# Altium PCB SCD2326控制板-V0.3.PcbDoc (part 2 of 2)
Units mil, origin at the board's own origin, x right, y up, seen from the top; angles counter-clockwise.
Board outline 4055.12 x 2086.61 mil, 2 copper layers (Top Layer, Bottom Layer), stack 12.8 mil thick; 202 components, 132 nets, 638 pads, 241 vias.
Unrouted connection lines stored in the file: 24.
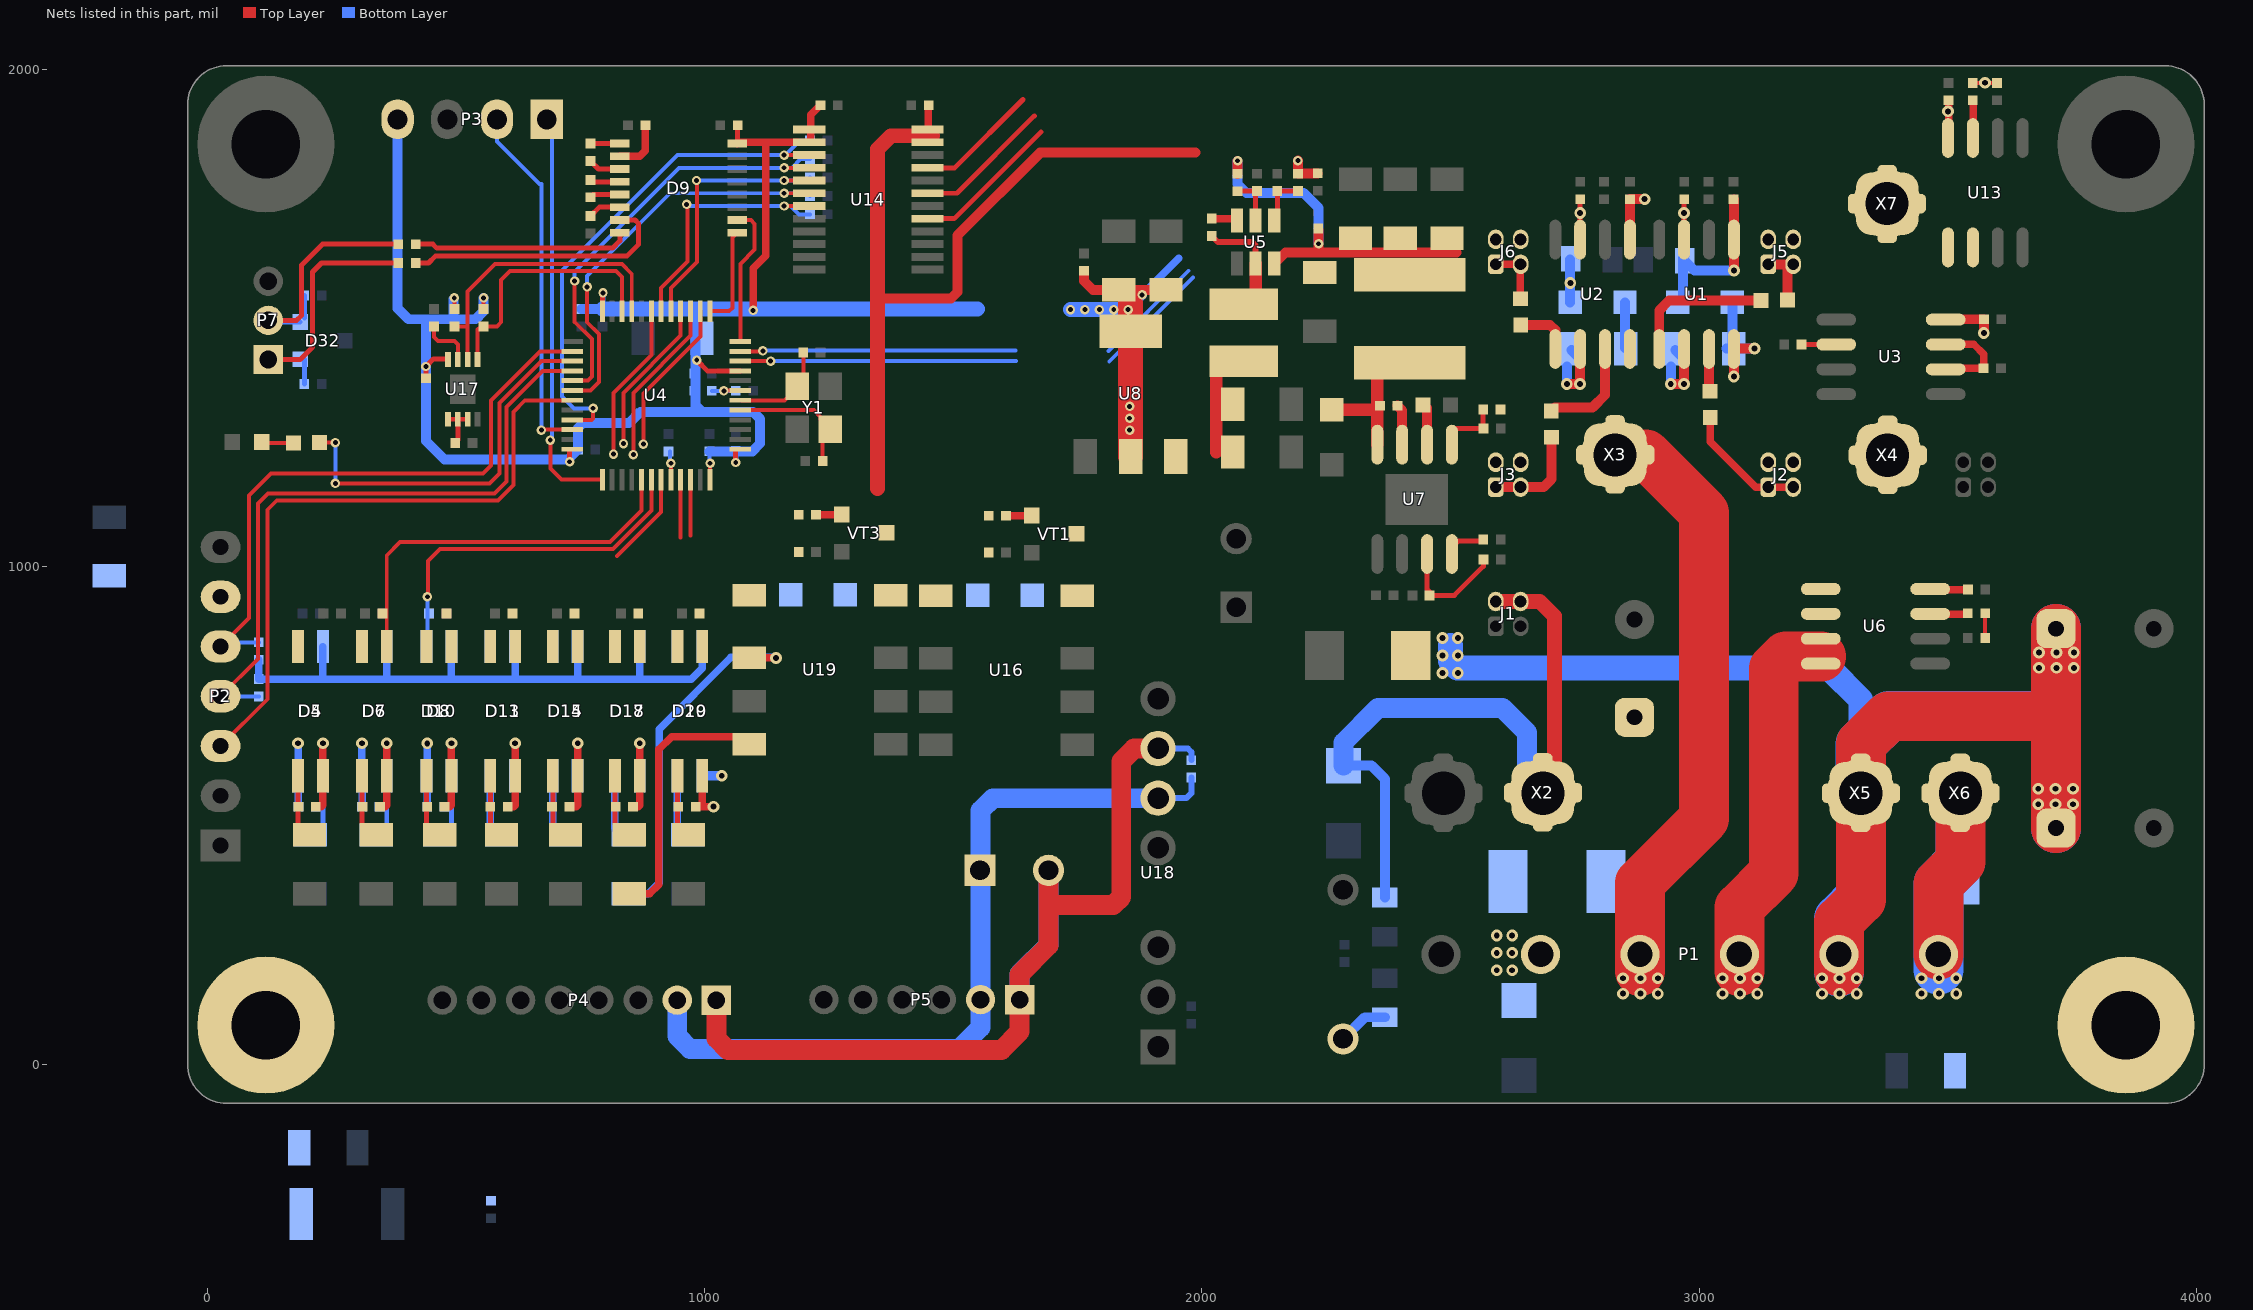
[diagram p2: the nets of this part, all layers, seen from the top]

## Via types
v1: diameter 18.9, hole 9.84, Top Layer to Bottom Layer, tented both sides, 125 vias
v2: diameter 23.62, hole 11.81, Top Layer to Bottom Layer, 114 vias
v3: diameter 18, hole 9.84, Top Layer to Bottom Layer, tented both sides, 2 vias

## Nets (pads, with @x,y where several pads share a name; then routed paths per layer and width w, separated by ;. In a path a pad name is that pad's centre, name@x,y a point inside that pad or via, vN(x,y) a via of type N, cw(c..) or ccw(c..) an arc to the next point about the centre after c; other vN are vias at no path point) (continued)
IN_4: D7.3 R35.2 U4.41 | length 795.1
  Top Layer w8: D7.3@361.19,840 361.19,1023.19 388,1050 810,1050 873.47,1113.47 U4.41@873.47,1175.71
IN_5: D8.3 R41.2 U4.42 | length 719.3
  Top Layer w8: v1@444,939 444,1012 468,1036 815.8,1036 893.16,1113.36 U4.42@893.16,1175.71
  Bottom Layer w8: D8.3@443,851 v1@443,943.81
  other v1: 443,940
IN_6: D10.3 R43.2 U4.43 | length 190.5
  Top Layer w8: 824,1022 912.84,1110.84 U4.43@912.84,1175.71
IN_7: D11.3 D13.3 R46.2 U4.19 | length 319.7
  Top Layer w8: v1@819,1227 817,1229 817,1350 893.16,1426.16 U4.19@893.16,1514.29
  other v1: 817.13,1226.87
IN_8: D14.3 D15.3 R49.2 U4.16 | length 314
  Top Layer w8: v1@837,1248 837,1350 952.21,1465.21 U4.16@952.21,1514.29
  other v1: 837.13,1247.87
IN_9: D17.3 D18.3 R53.2 U4.15 | length 335.9
  Top Layer w8: v1@857,1226 857,1350.2 971.9,1465.1 U4.15@971.9,1514.29
  other v1: 857.13,1225.87
IN_10: D19.3 D20.3 R56.2 U4.14 | length 314.8
  Top Layer w8: v1@877,1247 877,1349 991.58,1463.58 U4.14@991.58,1514.29
  other v1: 877.13,1246.87
LED1: R62.2 U4.27 | length 772.7
  Top Layer w8: R62.2@226,1250 v1(258,1250) ; v1(258,1168) 568,1168 588,1188 588,1330 671.9,1413.9 U4.27@733.71,1413.9
  Bottom Layer w8: v1@258,1170 v1(258,1250)
LIN_U: R13.2 U1.3 U14.19 | length 360.5
  Top Layer w10: U14.19@1448.4,1751.42 1507.79,1751.42 1663.37,1907 ; U1.3@2969.8,1658.24 R13.2@2969.8,1739.3
  other v2: 2969.8,1711.8
LIN_V: R8.2 U2.3 U14.17 | length 382.1
  Top Layer w10: U14.17@1448.4,1700.24 1502.24,1700.24 1677,1875 ; U2.3@2760.8,1658.24 R8.2@2760.8,1739.3
  other v2: 2760.8,1711.8
MCU_EepromSCL: R130.1 U4.21 U17.6 | length 599.6
  Top Layer w8: R130.1@496.98,1483.88 523.88,1483.88 ; U17.6@524,1417 524,1554 579,1609 834,1609 853.79,1589.21 U4.21@853.79,1514.29
MCU_EepromSDA: R131.1 U4.22 U17.5 | length 522.4
  Top Layer w8: U17.5@544,1417 544,1477 550.88,1483.88 R131.1@555.98,1483.88 582.88,1483.88 591,1492 591,1577 609,1595 822,1595 834.1,1582.9 U4.22@834.1,1514.29
MCU_OUT1: R59.2 U4.33 U14.3 | length 1045.7
  Top Layer w8: U4.33@733.71,1295.79 773,1295.79 776,1298.79 v1(776,1319) ; v1(1160.19,1828.19) U14.3@1210.4,1828.19
  Bottom Layer w8: v1(776,1319) 738,1319 714,1343 714,1596 946.19,1828.19 v1(1160.19,1828.19) 1163.19,1828.19 1192.39,1857.39 R59.2@1212.5,1857.39
MCU_PwmUH: R16.2 U4.29 U14.4 | length 887
  Top Layer w8: U4.29@733.71,1374.53 765.53,1374.53 774,1383 774,1458 739,1493 v1(739,1575) v1@739,1576 ; v1(1160.19,1802.6) U14.4@1210.4,1802.6
  Bottom Layer w8: v1(739,1575) 739,1593 948.6,1802.6 v1(1160.19,1802.6) 1175.6,1802.6 1193,1820 R16.2@1212.5,1820
MCU_PwmUL: R17.2 U4.17 U14.5 | length 566.6
  Top Layer w8: U4.17@932.53,1514.29 932.53,1560.53 985,1613 v1@985,1778 ; v1(1160.19,1777.01) U14.5@1210.4,1777.01
  Bottom Layer w8: v1(984.01,1777.01) v1(1160.19,1777.01) 1206.51,1777.01 R17.2@1212.5,1783
MCU_PwmVH: R18.2 U4.30 U14.6 | length 854.2
  Top Layer w8: U4.30@733.71,1354.84 770.84,1354.84 788,1372 788,1468 764,1492 v1(764,1563) ; v1(1160.19,1751.42) U14.6@1210.4,1751.42
  Bottom Layer w8: v1(764,1563) 764,1585 930.42,1751.42 v1(1160.19,1751.42) 1207.08,1751.42 R18.2@1212.5,1746
MCU_PwmVL: R20.2 U4.18 U14.7 | length 540.2
  Top Layer w8: U4.18@912.84,1514.29 912.84,1560.64 966,1613.8 v1@966,1730 ; v1(1160.19,1725.83) U14.7@1210.4,1725.83
  Bottom Layer w8: v1@967.17,1725.83 v1(1160.19,1725.83) 1173.17,1725.83 1190,1709 R20.2@1212.5,1709
  other v1: 964,1729
MOTOR_ALL: C40.1 R29.1 U4.10 | length 842.1
  Top Layer w8: U4.10@1072.29,1413.9 v1(1132.9,1413.9) ; R29.1@3550.15,1973.2 C40.1@3599.15,1973.2
  Bottom Layer w8: v1(1132.9,1413.9) 1626.9,1413.9 ; 1813.9,1412.9 1982.55,1581.55
  other v2: 3575,1973.57
MOTOR_U: C17.1 R12.1 U4.11 | length 828.8
  Top Layer w8: U4.11@1072.29,1433.58 v1@1118.58,1433.58 ; C17.1@3575.2,856.96 R12.1@3575.2,905.96
  Bottom Layer w8: v1@1120,1435 1625,1435 ; 1812,1434 1973.55,1595.55
  other v1: 1117.58,1434.58
NetC3_2: C3.2 D4.1 R22.1 | length 93.1
  Bottom Layer w10: 232.81,487.04 D4.1@232.81,580.16
NetC5_2: C5.2 D1.2 U1.8 | length 298.6
  Top Layer w20: v2(3069.8,1382.8) U1.8@3069.8,1438.24 ; U1.8@3069.8,1439 v2(3111.43,1439)
  Bottom Layer w20: C5.2@3055.24,1439.25 v2@3111.18,1439.25 ; C5.2@3066.94,1442.12 D1.2@3066.94,1531.79 ; v2@3070.06,1383.06 C5.2@3070.06,1439
NetC6_2: C6.2 U7.6 | length 82.1
  Top Layer w20: C6.2@2446.74,1325.61 2452.92,1319.43 U7.6@2452.92,1246.02
NetC8_2: C8.2 D2.2 U2.8 | length 91.7
  Bottom Layer w20: C8.2@2850.94,1440.12 D2.2@2850.94,1531.79
NetC10_2: C10.2 D5.1 R30.1 | length 95.7
  Top Layer w10: R30.1@182.81,484.42 D5.1@182.81,580.16
NetC11_2: C11.2 D13.1 R45.1 | length 95.7
  Top Layer w10: R45.1@569.38,484.42 D13.1@569.38,580.16
NetC12_2: C12.2 D15.1 R48.1 | length 95.7
  Top Layer w10: R48.1@695.15,484.42 D15.1@695.15,580.16
NetC14_2: C14.2 D6.1 R32.1 | length 97.7
  Bottom Layer w10: R32.1@361.19,482.42 D6.1@361.19,580.16
NetC19_2: C19.2 D7.1 R34.1 | length 95.7
  Top Layer w10: R34.1@311.19,484.42 D7.1@311.19,580.16
NetC20_2: C20.2 D8.1 R40.1 | length 94.7
  Bottom Layer w10: 491.19,485.42 D8.1@491.19,580.16
NetC22_2: C22.2 D10.1 R42.1 | length 95.7
  Top Layer w10: R42.1@441.19,484.42 D10.1@441.19,580.16
NetC30_1: C30.1 U7.7 | length 95.9
  Top Layer w10: C30.1@2393.24,1324.18 C30.1@2402.92,1314.5
  Top Layer w20: C30.1@2393.24,1324.18 2402.92,1314.5 U7.7@2402.92,1246.02
NetC30_2: C30.2 D12.2 FL4.1 U7.8 | length 250.3
  Top Layer w25: D12.2@2261.79,1315.94 C30.2@2349.99,1315.94 ; FL4.1@2339.06,1402.38 2352.92,1388.53 U7.8@2352.92,1246.02
NetC52_2: C52.2 D18.1 R52.1 | length 95.7
  Top Layer w10: R52.1@819.93,484.42 D18.1@819.93,580.16
NetC55_2: C55.2 D20.1 R55.1 | length 95.7
  Top Layer w10: R55.1@945.71,484.42 D20.1@945.71,580.16
NetC71_1: C71.1 U5.6 | length 52.5
  Top Layer w15: C71.1@2020,1700.5 2066.89,1700.5 U5.6@2070.84,1696.54
NetC71_2: C71.2 FL6.1 U5.2 | length 224.3
  Top Layer w12: C71.2@2020,1665.5 2032.5,1653 2101.22,1653 2108.25,1645.97 U5.2@2108.25,1609.93
  Top Layer w25: FL6.1@2084,1528 2108.25,1552.25 U5.2@2108.25,1609.93
NetC131_1: C131.1 D9.1 | length 46.5
  Top Layer w10: C131.1@771.65,1851.25 D9.1@816.78,1851.25
  Top Layer w15: C131.1@770.69,1852.21 C131.1@771.65,1851.25
NetC131_2: C131.2 D9.3 | length 53.3
  Top Layer w10: C131.2@770.69,1816.21 786.83,1800.07 D9.3@816.78,1800.07
  Top Layer w15: D9.3@816.4,1800.44 D9.3@816.78,1800.07
NetC132_1: C132.1 D9.4 | length 47.6
  Top Layer w10: C132.1@770.69,1778.21 774.42,1774.48 D9.4@816.78,1774.48
NetC132_2: C132.2 D9.5 | length 48.1
  Top Layer w10: C132.2@770.69,1743.21 C132.2@775.53,1748.05 ; C132.2@775.53,1748.89 D9.5@816.78,1748.89
NetC133_1: C133.1 D9.2 | length 102.9
  Top Layer w15: D9.2@829.78,1825.66 870.01,1825.66 881.2,1836.86 C133.1@881.2,1883.71
NetC134_1: C134.1 D9.6 | length 67.9
  Top Layer w10: C134.1@770.99,1705.51 788.78,1723.3 D9.6@829.78,1723.3 D9.6@830.99,1722.08
NetD9_7: D9.7 R67.1 | length 545.8
  Top Layer w10: R67.1@419.5,1611 445,1611 459,1625 844,1625 867,1648 867,1691 860.29,1697.71 D9.7@829.78,1697.71
NetD9_8: D9.8 R68.1 | length 436
  Top Layer w10: R68.1@419.5,1649 454,1649 462,1641 815,1641 829.78,1655.78 D9.8@829.78,1672.12
NetD11_2: D11.2 R44.1 | length 96.1
  Bottom Layer w15: R44.1@569.19,484.06 D11.2@569.19,580.16
NetD14_2: D14.2 R47.1 | length 92.9
  Bottom Layer w15: 694.97,487.28 D14.2@694.97,580.16
NetD16_2: D16.2 F1.2 P1.5
  other v2: 2593.1,189.1 2624.1,189.1 2593.1,224.1 2624.1,224.1 2593.1,259.1 2624.1,259.1
NetD17_2: D17.2 R51.1 | length 105.4
  Bottom Layer w15: R51.1@819.74,474.74 D17.2@819.74,580.16
NetD19_2: D19.2 R54.1 | length 127.3
  Bottom Layer w15: D19.2@945.52,580.16 945.52,482.14 R54.1@966.21,461.45
NetD22_1: D22.1 U16.8 VT1.3
NetD23_1: D23.1 R62.1 | length 61.9
  Top Layer w8: D23.1@111.6,1249.21 R62.1@173.48,1249.21
NetD24_1: D24.1 U19.8 VT3.3
NetR1_1: R1.1 U1.7 | length 83.2
  Top Layer w20: R1.1@3019.8,1355.06 U1.7@3019.8,1438.24
NetR2_1: R2.1 U2.7 | length 214.1
  Top Layer w20: R2.1@2702.61,1313.26 2710.35,1321 2786,1321 2810.8,1345.8 U2.7@2810.8,1438.24
NetR3_1: R3.1 U4.44 | length 55.5
  Top Layer w8: U4.44@932.27,1175.71 v1@932.27,1208.73
  Bottom Layer w8: v1@931,1210 R3.1@931,1232.5
  other v1: 932.4,1208.6
NetR5_1: R5.1 R50.2 U5.5 | length 107.3
  Top Layer w10: R50.2@2074,1755.77 R5.1@2110.95,1755.78 2108.25,1753.07 U5.5@2108.25,1686.54
NetR10_1: R10.1 U1.5 | length 290.7
  Top Layer w20: U1.5@2919.8,1438.24 2919.8,1515.8 2939.61,1535.61 R10.1@3124.74,1535.61
NetR11_1: R11.1 U2.5 | length 111.7
  Top Layer w20: R11.1@2641.39,1486.74 2700.26,1486.74 2710.8,1476.2 U2.5@2710.8,1438.24
NetR12_2: R12.2 U6.7 | length 74.6
  Top Layer w15: U6.7@3465.55,904.58 R12.2@3540.2,904.58
NetR14_2: R14.2 U7.4 | length 94.8
  Top Layer w10: U7.4@2502.92,1014.02 2502.92,1038.92 2516.5,1052.5 2563.62,1052.5 R14.2@2566.12,1055
NetR23_2: R23.2 R24.1 U7.3 | length 217.3
  Top Layer w10: U7.3@2452.92,1014.02 2452.92,955.12 R23.2@2461.73,946.31 ; R23.2@2458.23,942.81 2507.81,942.81 2566.12,1001.12 R24.1@2566.12,1015.02
NetR26_1: R26.1 R27.2 U7.5 | length 100.1
  Top Layer w10: U7.5@2505.22,1278.22 R27.2@2565.88,1278.22 ; R27.2@2565.88,1277.61 R27.2@2565.88,1278.22 ; R26.1@2565.88,1317.02 R27.2@2565.88,1278.22
NetR29_2: R29.2 U13.7 | length 74.6
  Top Layer w15: U13.7@3551.54,1863.55 R29.2@3551.54,1938.2
NetR36_2: R36.2 R37.1 U5.4 | length 113.2
  Top Layer w10: U5.4@2145.65,1696.54 U5.4@2151.78,1702.67 ; U5.4@2151.78,1692.67 R37.1@2151.78,1755.77 R36.2@2193.25,1755.77
NetR38_2: R38.2 U3.6 U3.7 | length 187
  Top Layer w15: U3.7@3495.76,1447.32 3552.68,1447.32 3572.12,1427.88 R38.2@3572.12,1399.5 U3.6@3497.94,1399.5
NetR51_2: R51.2 U19.2 | length 727.8
  Top Layer w15: U19.2@1090.02,817 v2(1144,817)
  Bottom Layer w15: R51.2@846.8,343.34 887.34,343.34 909,365 909,674 1053,818 v2@1143,818
NetR52_2: R52.2 U19.4 | length 537.6
  Top Layer w15: R52.2@848.79,343.34 890.34,343.34 908,361 908,633 934,659 1074.79,659 U19.4@1090,643.79
NetR58_1: R58.1 S1.2 | length 102.1
  Bottom Layer w20: S1.2@2284,51 2327.63,94.63 R58.1@2368,94.63
NetR60_2: R60.2 VT1.1 | length 51.5
  Top Layer w15: R60.2@1606.5,1103 VT1.1@1658,1103
NetR64_2: R64.2 VT3.1 | length 51.5
  Top Layer w15: R64.2@1224.5,1105 VT3.1@1276,1105
NetR118_1: R118.1 U17.7 | length 106.1
  Top Layer w8: R118.1@455.98,1483.88 455.98,1462.02 464,1454 497,1454 504,1447 U17.7@504,1417
NetR132_1: R132.1 U17.1 U17.2 U17.3 | length 90.5
  Top Layer w6: R132.1@497.88,1249.02 R132.1@504,1255.14
  Top Layer w10: U17.1@484,1297 U17.2@504,1297 ; R132.1@504,1255.14 U17.2@504,1297 ; U17.3@524,1297 U17.2@504,1297
OSC_IN: C27.1 U4.5 Y1.3 | length 264.8
  Top Layer w8: U4.5@1077.57,1315.55 1219.82,1315.55 1233.62,1301.75 1233.62,1296.26 Y1.3@1253.24,1276.64 1237.81,1261.21 C27.1@1237.81,1213.26
OSC_OUT: C28.1 U4.6 Y1.1 | length 196.2
  Top Layer w8: U4.6@1074.57,1334.41 1160.68,1334.41 1165.96,1339.7 1166.69,1339.7 1186.31,1359.32 Y1.1@1186.31,1363.26 1198.81,1375.76 C28.1@1198.81,1428.26
OUT1: R25.1 U3.2 U14.21 | length 318.3
  Top Layer w10: U14.21@1448.4,1802.6 1502.97,1802.6 1640.37,1940 ; R25.1@3206.12,1447.5 U3.2@3275.59,1447.5
OUT_1: D3.1 P1.1 pad.3 X6.1 | length 716
  Top Layer w100: P1.1@3481.2,220.9 3481.2,363.1 3525.49,407.39 X6.1@3525.49,545
  Bottom Layer w100: P1.1@3481.2,190 3481.2,363.1 3525.2,407.1 pad.3@3525.2,545.29
  other v2: 3447,142 3482,142 3517,142 3447,173 3482,173 3517,173
PE1: C46.2 pad.4@118.11,78.74 R69.2
PE2: C47.2 pad.4@3858.27,78.74
RELAY1: R60.1 R61.2 U4.45 | length 116.9
  Top Layer w8: 952.21,1058.79 U4.45@952.21,1175.71
RELAY2: R64.1 R65.2 U4.46 | length 112.6
  Top Layer w8: 971.9,1063.1 U4.46@971.9,1175.71
RES: P2.3 U4.31 | length 1303.9
  Top Layer w8: P2.3@27,640 121,734 121,1115 140,1134 585,1134 616,1165 616,1312 639.16,1335.16 U4.31@733.71,1335.16
RESET: C29.1 R19.1 U4.7 | length 81.5
  Top Layer w8: v1(1039.07,1354.08) 1039.46,1354.46 1071.91,1354.46 U4.7@1072.29,1354.84
  Bottom Layer w8: R19.1@1015.07,1354.08 v1(1039.07,1354.08) C29.1@1063.07,1354.08
RXD: D9.9 U4.13 | length 202.8
  Top Layer w8: U4.13@1011.27,1514.29 1049.29,1514.29 1056,1521 1056,1662.12 D9.9@1066,1672.11
RXD_232: C38.1 D32.2 P7.2 R68.2 | length 489.9
  Top Layer w10: P7.2@123,1495.74 179.74,1495.74 190,1506 190,1607 232,1649 R68.2@384.5,1649
  Bottom Layer w10: P7.2@126.24,1492.5 D32.2@187,1492.5 ; D32.2@195.5,1501 C38.1@195.5,1546
SCL: P2.5 R66.1 U4.26 | length 1242.5
  Top Layer w8: P2.5@27,840 84,897 84,1144 128,1188 555,1188 571,1204 571,1335 669.58,1433.58 U4.26@733.71,1433.58
  Bottom Layer w8: P2.5@35.5,848.5 R66.1@104,848.5
SDA: P2.4 R63.1 U4.28 | length 1325.4
  Top Layer w8: P2.4@27,740 102,815 102,1128 122,1148 578,1148 602,1172 602,1322 674.21,1394.21 U4.28@733.71,1394.21
  Bottom Layer w8: P2.4@27.5,739.5 R63.1@104,739.5
SWCLK: P3.1 U4.37 | length 817.9
  Top Layer w8: v1@690,1257 690,1198 712.29,1175.71 U4.37@794.73,1175.71
  Bottom Layer w8: P3.1@683,1900 P3.1@690,1893 ; v1@693,1258 P3.1@693,1893
  other v1: 690,1255
SWDIO: P3.2 U4.34 | length 725.9
  Top Layer w8: v1@668,1276.1 U4.34@733.71,1276.1
  Bottom Layer w8: P3.2@583,1900 583,1855 668,1770 ; v1(672,1275) 672,1770
TXD: D9.10 U4.12 | length 286.8
  Top Layer w8: D9.10@1066,1697.71 1093.29,1697.71 1101,1690 1101,1638 1072.29,1609.29 U4.12@1072.29,1453.27
TXD_232: C21.1 D32.1 P7.1 R67.2 | length 543.5
  Top Layer w10: P7.1@123,1417 187,1417 212,1442 212,1593 230,1611 R67.2@384.5,1611
  Bottom Layer w10: P7.1@123,1417 123.5,1417.5 D32.1@187,1417.5 ; C21.1@195.5,1368 D32.1@195.5,1417
U: P1.3 U6.3 U6.4 | length 742.5
  Top Layer w100: P1.3@3081.1,187 3081.1,315.1 3150,384 3150,796 3174,820 3245,820
  other v2: 3047,142 3082,142 3117,142 3047,173 3082,173 3117,173
U+: C5.1 J2.2 J2.4 pad.4@3379.11,1224.63 U1.6 U6.1 U6.2 X4.1 | length 196.4
  Top Layer w20: v2(2943,1368) v2(2969.61,1368) 2969.61,1381.24 U1.6@2969.61,1427.47
  Bottom Layer w20: v2(2943,1368) 2943,1403.08 ; C5.1@2952,1436 2969.61,1418.39 v2(2969.61,1368)
U_GH: J2.1 J2.3 R1.2 | length 253.5
  Top Layer w15: R1.2@3022.39,1300.74 3022.39,1251.61 3113.48,1160.52 J2.1@3139,1160.52 J2.3@3189,1160.52
U_GL: J5.1 J5.3 R10.2 | length 110.4
  Top Layer w20: J5.1@3139,1608.52 J5.3@3189,1608.52 ; R10.2@3177.26,1536.39 J5.3@3177.26,1596.78
V: C8.1 J3.2 J3.4 P1.4 pad.5 U2.6 X3.1 | length 1399.4
  Top Layer w20: v2(2734,1368) v2(2760.61,1368) 2760.61,1381.24 U2.6@2760.61,1427.47
  Top Layer w100: X3.1@2831,1226.31 2892.69,1226.31 3010,1109 3010,494 2881.1,365.1 P1.4@2881.1,187
  Bottom Layer w20: v2(2734,1368) 2734,1403.08 ; C8.1@2743,1436 2760.61,1418.39 v2(2760.61,1368)
  other v2: 2847,142 2882,142 2917,142 2847,173 2882,173 2917,173
V-: J5.2 J5.4 J6.2 J6.4 pad.6 U13.1 U13.2 X7.1
V_GH: J3.1 J3.3 R2.2 | length 203.3
  Top Layer w20: J3.1@2591,1160.52 J3.3@2641,1160.52 2687.52,1160.52 2703.39,1176.39 R2.2@2703.39,1260.74
V_GL: J6.1 J6.3 R11.2 | length 118.1
  Top Layer w15: J6.1@2591,1608.52 J6.3@2640.21,1608.52 ; R11.2@2640.61,1539.26 J6.3@2640.61,1608.13
VCC_3.3V: C2.1 C13.2 C23.1 C31.1 C32.1 C33.1 C34.1 C35.1 C39.2 C43.1 C44.1 C45.1 C51.2 C67.1 C76.1 C90.1 D4.4 D5.4 D6.4 D7.4 D8.4 D9.16 D10.4 D11.4 D13.4 D14.4 D15.4 D17.4 D18.4 D19.4 D20.4 P2.6 P3.4 R19.2 R63.2 R66.2 R130.2 R131.2 U4.1 U4.9 U4.24 U4.36 U4.48 U6.8 U8.2 U8.4 U13.8 U14.1 U14.2 U17.8 | length 6158.9
  Top Layer w8: R130.2@496.98,1518.88 v1(496.98,1541.02) ; R131.2@555.98,1518.88 v1(555.98,1541.02) ; U4.48@1011.27,1175.71 v1@1011.27,1208.73
  Top Layer w10: C45.1@439.99,1379.51 v1(439.99,1402.99) 455,1418 483.1,1418 484,1417.1 U17.8@484,1417 ; v1(729,1211.57) U4.36@729,1232.02 ; U4.24@794.73,1514.29 v1@794.73,1549.73 ; v1@986,1414 1005.79,1394.21 U4.9@1072.29,1394.21 ; U4.1@1062.73,1235 1062.73,1210.27 v1(1063,1210) ; D9.16@1066,1851.25 C90.1@1066,1887.15
  Top Layer w15: D9.16@1066,1851.25 1068.53,1853.78 1123,1853.78 ; v1(1098,1516) 1098,1600.39 1123,1625.39 1123,1853.78 ; U14.2@1210.4,1853.78 1123,1853.78 ; U14.2@1213.65,1853.78 1214.02,1854.15 1214.02,1909.17 C2.1@1233.04,1928.19 ; U6.8@3465.55,954.58 C13.2@3540.2,954.58 ; U13.8@3501.54,1863.55 C39.2@3501.54,1938.2
  Top Layer w20: C51.2@1763,1595.5 1763,1575 1781.06,1556.94 C23.1@1832.98,1556.94 C76.1@1928,1556.94
  Top Layer w50: U8.2@1857,1222.02 U8.4@1857,1473.98 1857,1531
  Bottom Layer w8: v1@1010,1210 C35.1@1010,1232.5
  Bottom Layer w10: C31.1@795,1518.5 796,1519.5 v1(796,1551) ; v1(1063,1210) 1063,1232.5 C33.1@1063,1233.5
  Bottom Layer w15: R66.2@104,813.5 R63.2@104,774.5 973.5,774.5 995.52,796.52 D19.4@995.52,840 ; 232.81,774.53 D4.4@232.81,840 ; 361.19,774.53 D6.4@361.19,840 ; 491.19,774.53 D8.4@491.19,840 ; 619.19,774.53 D11.4@619.19,840 ; 744.97,774.53 D14.4@744.97,840 ; 869.74,775.24 D17.4@869.74,840 ; v1(1880,1547) 1954.05,1621.05
  Bottom Layer w20: P3.4@383,1900 383,1520 405,1498 495,1498 ; 443,1498 439.99,1494.99 v1(439.99,1402.99) 439.99,1253.01 477,1216 725.5,1216 C34.1@745.5,1236 745.5,1279.5 755,1289 848,1289 871,1312 995,1312 ; v1@495,1539.04 495,1498 ; v1(555.98,1541.02) 555.98,1513.98 540,1498 495,1498 ; C67.1@753,1518.5 C31.1@795,1518.5 ; 982,1516.5 982,1325 995,1312 ; C35.1@1010,1232.5 1063,1232.5 1096.5,1232.5 1112,1248 1112,1298 1098,1312 995,1312 ; v1@1850.5,1517.5 v1(1880,1547)
  Bottom Layer w30: C31.1@795,1518.5 1549,1518.5 ; v1(1736,1517.5) v1@1850.5,1517.5
  Bottom Layer w40: v1(1855,1275) v1(1855,1299) v1(1855,1323)
  other v1: 1011.4,1208.6 984.48,1415.89 1765,1517.5 1794,1517.5 1823,1517.5 1852,1517.5
  other v2: 3500.45,1916.03
VCC_5V: C18.1 C53.2 C77.1 C109.1 D22.2 D24.2 FL6.2 R36.1 U8.3 U14.23 U14.24 U16.1 U19.1 | length 1992.1
  Top Layer w15: U14.24@1450.02,1879.37 C109.1@1450.02,1925
  Top Layer w20: 1348,1540 1496,1540 1509,1553 1509,1667 1675,1833 1987,1833 ; v1@2193.25,1812.75 R36.1@2193.25,1790.77 ; v1(2193.25,1816.95) R36.1@2193.25,1790.77 ; C53.2@2232.28,1790.77 R36.1@2193.25,1790.77
  Top Layer w25: 2028.94,1231 2028.94,1327 2028.94,1396.94 2045.82,1413.82 FL6.2@2084,1413.82
  Top Layer w30: 1348,1158 1348,1540 1348,1840 1375,1867 1459,1867
VCC_12V: C1.2 C4.2 C7.2 C15.1 C16.2 C36.1 C41.1 C42.1 C49.2 C160.2 D1.1 D2.1 FL4.2 R26.2 R50.1 U1.1 U2.1 U3.8 U5.3 | length 1398.7
  Top Layer w20: R50.1@2072,1790.5 v1(2072,1816.67) ; U5.3@2145.65,1609.93 2168.25,1632.53 2512,1632.53 ; 2235,1637 C16.2@2235,1677.58 ; v1(2235,1649.83) C16.2@2235,1676 ; U2.1@2860.8,1658.24 C7.2@2860.8,1739.3 ; C7.2@2861,1739.5 v2(2890.5,1739.5) ; v2@3069.8,1596.2 U1.1@3069.8,1658.24 C4.2@3069.8,1738.7 ; U3.8@3496.45,1498.01 C160.2@3572.51,1498.01 v2(3572.51,1470.51)
  Bottom Layer w20: v1(2072,1816.67) 2072,1770 2090,1752 2205,1752 2235,1722 v1@2235,1650 ; D2.1@2740.7,1531.79 C49.2@2740.7,1618.49 ; D1.1@2967.23,1542.31 C1.2@2967.23,1620.02 ; C1.2@2970.77,1615.98 2990.75,1596 v2(3070,1596)
  other v2: 2741,1571
VEE: C3.1 C10.1 C11.1 C12.1 C14.1 C19.1 C20.1 C22.1 C50.1 C52.1 C54.2 C55.1 D4.2 D5.2 D6.2 D7.2 D8.2 D10.2 D13.2 D15.2 D18.2 D20.2 P4.1 P5.1 U18.7 | length 3264
  Top Layer w15: C10.1@218.49,518 230,518 232.81,520.81 D5.2@232.81,580.16 v2(232.81,645.62) ; C19.1@346.87,518 358.38,518 361.19,520.81 D7.2@361.19,580.16 v2(361.19,645.62) ; C22.1@476.87,518 488.38,518 491.19,520.81 D10.2@491.19,580.16 v2(491.19,645.62) ; C11.1@605.06,518 616.56,518 619.38,520.81 D13.2@619.38,580.16 v2(619.38,645.62) ; C12.1@730.84,518 742.34,518 745.15,520.81 D15.2@745.15,580.16 v2(745.15,645.62) ; C52.1@855.62,518 867.12,518 869.93,520.81 D18.2@869.93,580.16 v2(869.93,645.62) ; C55.1@981.39,518 C55.1@982.5,518 992.9,518 ; D20.2@995.71,580.16 995.71,520.81 992.9,518 ; v2(1018,518) 992.9,518
  Top Layer w40: P4.1@1024,129 1024,52 1047,29 1597,29 1633.85,65.85 P5.1@1633.85,130 1633.85,180.85 1691.8,238.8 1691.8,320 ; C54.2@1691.8,390 1691.8,320 ; U18.7@1912,635 1864,635 1838,609 1838,336 1822,320 1691.8,320
  Bottom Layer w12: U18.7@1912,635 1972,635 1979,628 C50.1@1979,611.5
  Bottom Layer w15: D4.2@182.81,580.16 v2(182.81,645.62) ; C3.1@183.49,518 D4.2@183.49,579.47 ; D6.2@311.19,580.16 v2(311.19,645.62) ; C14.1@311.49,518.01 D6.2@311.49,579.85 ; C20.1@442.49,518 v2(442.49,645.31)
  Bottom Layer w40: P5.1@1633.85,130 1633.85,181.85 1691.8,239.8 C54.2@1691.8,390
VEE_24V: C50.2 C54.1 D11.1 D14.1 D17.1 D19.1 P4.2 P5.2 U18.6 | length 1655.8
  Bottom Layer w12: U18.6@1912,535 1969,535 1979,545 C50.2@1979,576.5
  Bottom Layer w20: D19.1@995.52,580.16 v2(1034.84,580.16)
  Bottom Layer w40: P4.2@945.26,129 945.26,56.74 971,31 1512,31 1555.11,74.11 P5.2@1555.11,130 1555.11,510.11 1580,535 U18.6@1912,535
VIN: C9.1 D21.1 F1.1 J1.2 J1.4 pad.1 R57.2 X2.1 | length 1356.6
  Top Layer w30: J1.2@2591,930.52 J1.4@2641,930.52 2679.48,930.52 2709,901 X2.1@2709,560
  Bottom Layer w20: D21.1@2285,600.39 2341.61,600.39 2368,574 R57.2@2368,335.37
  Bottom Layer w40: D21.1@2285,600.39 2285,647 2354,716 2605,716 2653.5,667.5 pad.1@2653.5,578.5
VP+: C24.1 C25.1 C26.2 D3.2 P1.2 pad.2 VD5.1 X5.1 | length 3613.2
  Top Layer w100: P1.2@3281.1,187 3281.1,287.1 3325.39,331.39 X5.1@3325.39,545 3325.39,644.39 3381,700 3665,700 ; C24.1@3717.57,475 C25.1@3717.57,876
  Bottom Layer w50: 2500,842 2500,811 2514,797 3261,797 3325,733 pad.2@3325,545
  Bottom Layer w100: P1.2@3281.1,186 3281.1,292.1 3325.1,336.1 pad.2@3325.1,545.29 ; pad.2@3324,534 3324,643 3382,701 3710,701 ; C24.1@3717.57,475 C25.1@3717.57,876
  other v2: 3247,142 3282,142 3317,142 3247,173 3282,173 3317,173 3681.77,522.9 3716.77,522.9 3751.77,522.9 3681.77,553.9 3716.77,553.9 3751.77,553.9 2483.9,786.9 2514.9,786.9 3683.37,797.1 3718.37,797.1 3753.37,797.1 2483.9,821.9 2514.9,821.9 3683.37,828.1 3718.37,828.1 3753.37,828.1 2483.9,856.9 2514.9,856.9
pads on no net: D9.11 D9.12 D9.13 D9.14 U3.1 U3.4 U4.2 U4.3 U4.4 U4.20 U6.6 U13.6 U14.14 U14.15 U14.16 U18.3 U18.5 U18.8

## Polygon pours and split planes (outlines as drawn)
VIN on Top Layer "Top Layer-No Net" (solid, remove dead copper, pour order 42): 2603,475 2603,723 2617,737 2913,737 2929,721 2929,555 2837,463 2615,463 2603,475
GND on Top Layer "Top Layer-No Net" (solid, remove dead copper, pour order 41): 2556,-62 2420,-62 2405,-47 2405,622 2419,636 2550,636 2566,620 2566,496 2545,475 2545,56 2563,38
OUT_1 on Top Layer "Top Layer-No Net" (solid, remove dead copper, pour order 40): 3469,628 3581,628 3604,605 3604,371 3551,318 3531,298 3531,128 3439,128 3427,140 3427,385 3448,406 3448,610 3465,627
VP+ on Top Layer "Top Layer-No Net" (solid, remove dead copper, pour order 38): 3277,609 3252,584 3252,352 3227,327 3227,137 3235,129 3382,129 3389,136 3389,627 3389,629 3418,658 3405,671 3338,671
U on Top Layer "Top Layer-No Net" (solid, remove dead copper, pour order 32): 3175,870 3116,870 3100,854 3100,438 3026,364 3026,134 3032,128 3152,128 3159,135 3159,305 3206,352 3211,357 3211,604 3211,685 3294,768 3308,782 3308,851 3289,870 3284,870
U+ on Top Layer "Top Layer-No Net" (solid, remove dead copper, pour order 31): 3237,894 3116,894 3101,909 3101,984 3245,1128 3351.5,1128 3457,1022.5 3438.5,1004 3383,1004 3360,1004 3344,988 3344,907 3331,894
VIN on Top Layer "Top Layer-No Net" (solid, remove dead copper, pour order 25): 2631,630 2754,630 2772,612 2772,471 2764,463 2615,463 2603,475 2603,614 2620,631
GND on Top Layer "Top Layer-No Net" (solid, remove dead copper, pour order 24): 3589,1624 3589,1586 3601,1574 3734,1574 3745,1585 3745,1698 3697,1746 3602,1746 3589,1733
V- on Top Layer "Top Layer-No Net" (solid, remove dead copper, pour order 23): 3376,1811 3306,1811 3287,1792 3287,1588 3301,1574 3553,1574 3562,1583 3562,1733 3549,1746 3472,1746 3459,1759 3459,1801 3449,1811
U+ on Top Layer "Top Layer-No Net" (solid, remove dead copper, pour order 22): 3317,1004.5 3439,1004.5 3457,1022.5 3457,1297.5 3440,1314.5 3261,1314.5 3244,1297.5 3244,1017.5 3258,1003.5
GND on Top Layer "Top Layer-No Net" (solid, pour order 39): 1789,1248 1789,1292 1781,1300 1687,1300 1682,1295 1682,1166 1689,1159 1781,1159 1789,1167
GND on Top Layer "Top Layer-No Net" (solid, pour order 34): 2082,1586 2003,1586 1948,1641 1943,1646 1769,1646 1763,1646 1755,1654 1755,1692 1761,1698 1973,1698 1984,1687 1992,1679 1992,1652 1992,1646 2006,1632 2007,1633 2083,1633
VCC_3.3V on Top Layer "Top Layer-No Net" (solid, pour order 36): 1961,1581 1937,1605 1766,1605 1735,1605 1721,1591 1721,1346 1723,1344 1964,1344 1977,1357 1977,1566 1958,1585
VCC_5V on Top Layer "Top Layer-No Net" (solid, pour order 37): 1925,1257 1925,1183 1932,1176 2071,1176 2079,1184 2079,1408.82 2084,1413.82 2053.18,1383 2017,1383 2017,1360 1950,1293 1925,1268 1925,1245
VP+ on Bottom Layer "Top Layer-No Net" (solid, remove dead copper, pour order 35): 3236,129 3378,129 3388,139 3388,626 3416,654 3416,744 3410,750 3299,750 3252,703 3252,350 3227,325 3227,138 3236,129
OUT_1 on Bottom Layer "Top Layer-No Net" (solid, remove dead copper, pour order 33): 3472,629 3582,629 3605,606 3605,143 3590,128 3438,128 3428,138 3428,378 3448,398 3448,609 3466,627
OUT_1 on Bottom Layer "Top Layer-No Net" (solid, remove dead copper, pour order 27): 3475,272 3441,272 3430,261 3430,135 3436,129 3525,129 3531,135 3531,264 3523,272
VP+ on Bottom Layer "Top Layer-No Net" (solid, remove dead copper, pour order 28): 3275,272 3241,272 3230,261 3230,135 3236,129 3325,129 3331,135 3331,264 3323,272
U on Bottom Layer "Top Layer-No Net" (solid, remove dead copper, pour order 29): 3075,272 3041,272 3030,261 3030,135 3036,129 3125,129 3131,135 3131,264 3123,272
V on Bottom Layer "Top Layer-No Net" (solid, remove dead copper, pour order 30): 2875,272 2841,272 2830,261 2830,135 2836,129 2925,129 2931,135 2931,264 2923,272
GND on Bottom Layer "Top Layer-No Net" (solid, remove dead copper, pour order 26): 2404,620 2420,636 2550,636 2566,620 2566,497 2544,475 2544,55 2563,36 2563,-62 2438,-62 2427,-51 2427,464 2404,487

## Other copper
Top Layer:
  rectangle net NetD16_2: 2572,148 2719,275
  region net GND: 2919.1,987.33 2820.1,987.33 2820.1,852 2919.1,852
  region net VP+: 2528.9,771.9 2528.9,870.9 2424.9,870.9 2424.9,771.9
  rectangle net OUT_1: 3432,128 3531,232
  rectangle net VP+: 3232,128 3331,232
  rectangle net U: 3032,128 3131,232
  rectangle net V: 2832,128 2931,232
  pour cut-out: 1998,1383 1999,1382 2165,1382 2165,1545 2164,1546 1999,1546
  pour cut-out: 2293,1609 2293,1372 2290,1369 2539,1369 2539,1607 2537,1609
Bottom Layer:
  rectangle net VIN: 2602,463 2928,736
  rectangle net VIN: 2764,304 2928,630
  rectangle net NetD16_2: 2573,84 2718,437
  region net PE2: 3494,48 3494,-60 3842,-60 3857,-45 3854,-45 3746,94 3690,48
  pour cut-out: 2000,1544 2164,1544 2165,1543 2165,1383 2000,1383
  pour cut-out: 2292,1370 2294,1368 2538,1368 2538,1604 2293,1604

## Silkscreen, mask and mechanical layers (free items; w line width, h text height)
Top Overlay:
  lines w5.98: 2369.92,544.71 2486.02,544.71 ; 2570.02,545.71 2686.12,545.71 ; 2715.69,1225.23 2831.79,1225.23 ; 2831.49,1225.52 2831.49,1341.62 ; 3209.69,544.71 3325.79,544.71 ; 3262.29,1729.44 3378.39,1729.44 ; 3263.4,1224.34 3379.5,1224.34 ; 3378.1,1729.73 3378.1,1845.83 ; 3379.21,1224.63 3379.21,1340.73 ; 3409.79,544.71 3525.89,544.71 ; 2591,880.52 2641,880.52 2641,930.52 2591,930.52 2591,880.52 ; 2591,1160.64 2591,1210.64 2641,1210.64 2641,1160.64 2591,1160.64 ; 2591,1608.64 2591,1658.64 2641,1658.64 2641,1608.64 2591,1608.64 ; 3139.11,1160.64 3139.11,1210.64 3189.11,1210.64 3189.11,1160.64 3139.11,1160.64 ; 3139.11,1608.64 3139.11,1658.64 3189.11,1658.64 3189.11,1608.64 3139.11,1608.64 ; 3531.11,1160.64 3531.11,1210.64 3581.11,1210.64 3581.11,1160.64 3531.11,1160.64
  text "Load_module" at 1715,1919 h100
  text "V0.2" at 2315,1918 h100
  text "3.3V" at 404,1682 h45 r90
  text "GND" at 504,1682 h45 r90
  text "DIO" at 604,1682 h45 r90
  text "CLK" at 704,1682 h45 r90
  text "GND" at 224,1557 h45
  text "RXD" at 227,1476 h45
  text "TXD" at 224,1399.52 h45
  text "GND" at 131,1027 h45
  text "3.3V" at 131,927 h45
  text "SCL" at 131,827 h45
  text "SDA" at 131,727 h45
  text "RES" at 131,627 h45
  text "DC" at 131,527 h45
  text "CS" at 131,427 h45
  text "1" at 486,-63 h45
  text "2" at 564.74,-63 h45
  text "3" at 643.48,-63 h45
  text "4" at 722.22,-63 h45
  text "5" at 811.18,-63 h45
  text "6" at 879.7,-63 h45
  text "24V" at 952,-63 h45
  text "GND" at 1091,-63 h45
  text "7" at 1265.33,-63 h45
  text "8" at 1344.07,-63 h45
  text "9" at 1419.03,-63 h45
  text "10" at 1487.55,-63 h45
  text "24V" at 1577,-63 h45
  text "GND" at 1728,-63 h45
  text "V-" at 2488,-63 h45
  text "V+" at 2694,-63 h45
  text "V" at 2899,-63 h45
  text "U" at 3102,-63 h45
  text "V+" at 3292,-63 h45
  text "OUT" at 3488,-63 h45
Mechanical 1:
  the board outline again, w10
Mechanical 3:

## Text inside footprints (layer, text, board x,y; h text height)
J1: Top Overlay "3" at 2689.41,861 h20; Top Overlay "1" at 2533.32,858.28 h20; Top Overlay "2" at 2529.39,917.33 h20; Top Overlay "4" at 2689.41,911.52 h20
J2: Top Overlay "3" at 3237.41,1141 h20; Top Overlay "1" at 3081.32,1138.28 h20; Top Overlay "2" at 3077.39,1197.33 h20; Top Overlay "4" at 3237.41,1191.52 h20
J3: Top Overlay "3" at 2689.41,1141 h20; Top Overlay "1" at 2533.32,1138.28 h20; Top Overlay "2" at 2529.39,1197.33 h20; Top Overlay "4" at 2689.41,1191.52 h20
J4: Top Overlay "3" at 3629.41,1141 h20; Top Overlay "1" at 3473.32,1138.28 h20; Top Overlay "2" at 3469.39,1197.33 h20; Top Overlay "4" at 3629.41,1191.52 h20
J5: Top Overlay "3" at 3237.41,1589 h20; Top Overlay "1" at 3081.32,1586.28 h20; Top Overlay "2" at 3077.39,1645.33 h20; Top Overlay "4" at 3237.41,1639.52 h20
J6: Top Overlay "3" at 2689.41,1589 h20; Top Overlay "1" at 2533.32,1586.28 h20; Top Overlay "2" at 2529.39,1645.33 h20; Top Overlay "4" at 2689.41,1639.52 h20
S1: Mechanical 6 "1" at 2277,99.9 h13.07